# Altium PCB STM32H743I-EVAL2PCBDESIGN.PcbDoc (part 14 of 23)
Units mil, origin at the board's own origin, x right, y up, seen from the top; angles counter-clockwise.
Board outline 6558 x 5417 mil, 8 copper layers (L1_TOP, L2_GND, L3_HS1, L4_POWER, L5_SIG, L6_HS2, L7_GND, L8_BOTTOM), stack 61.368 mil thick; 620 components, 588 nets, 2945 pads, 1724 vias.
Unrouted connection lines stored in the file: 1.
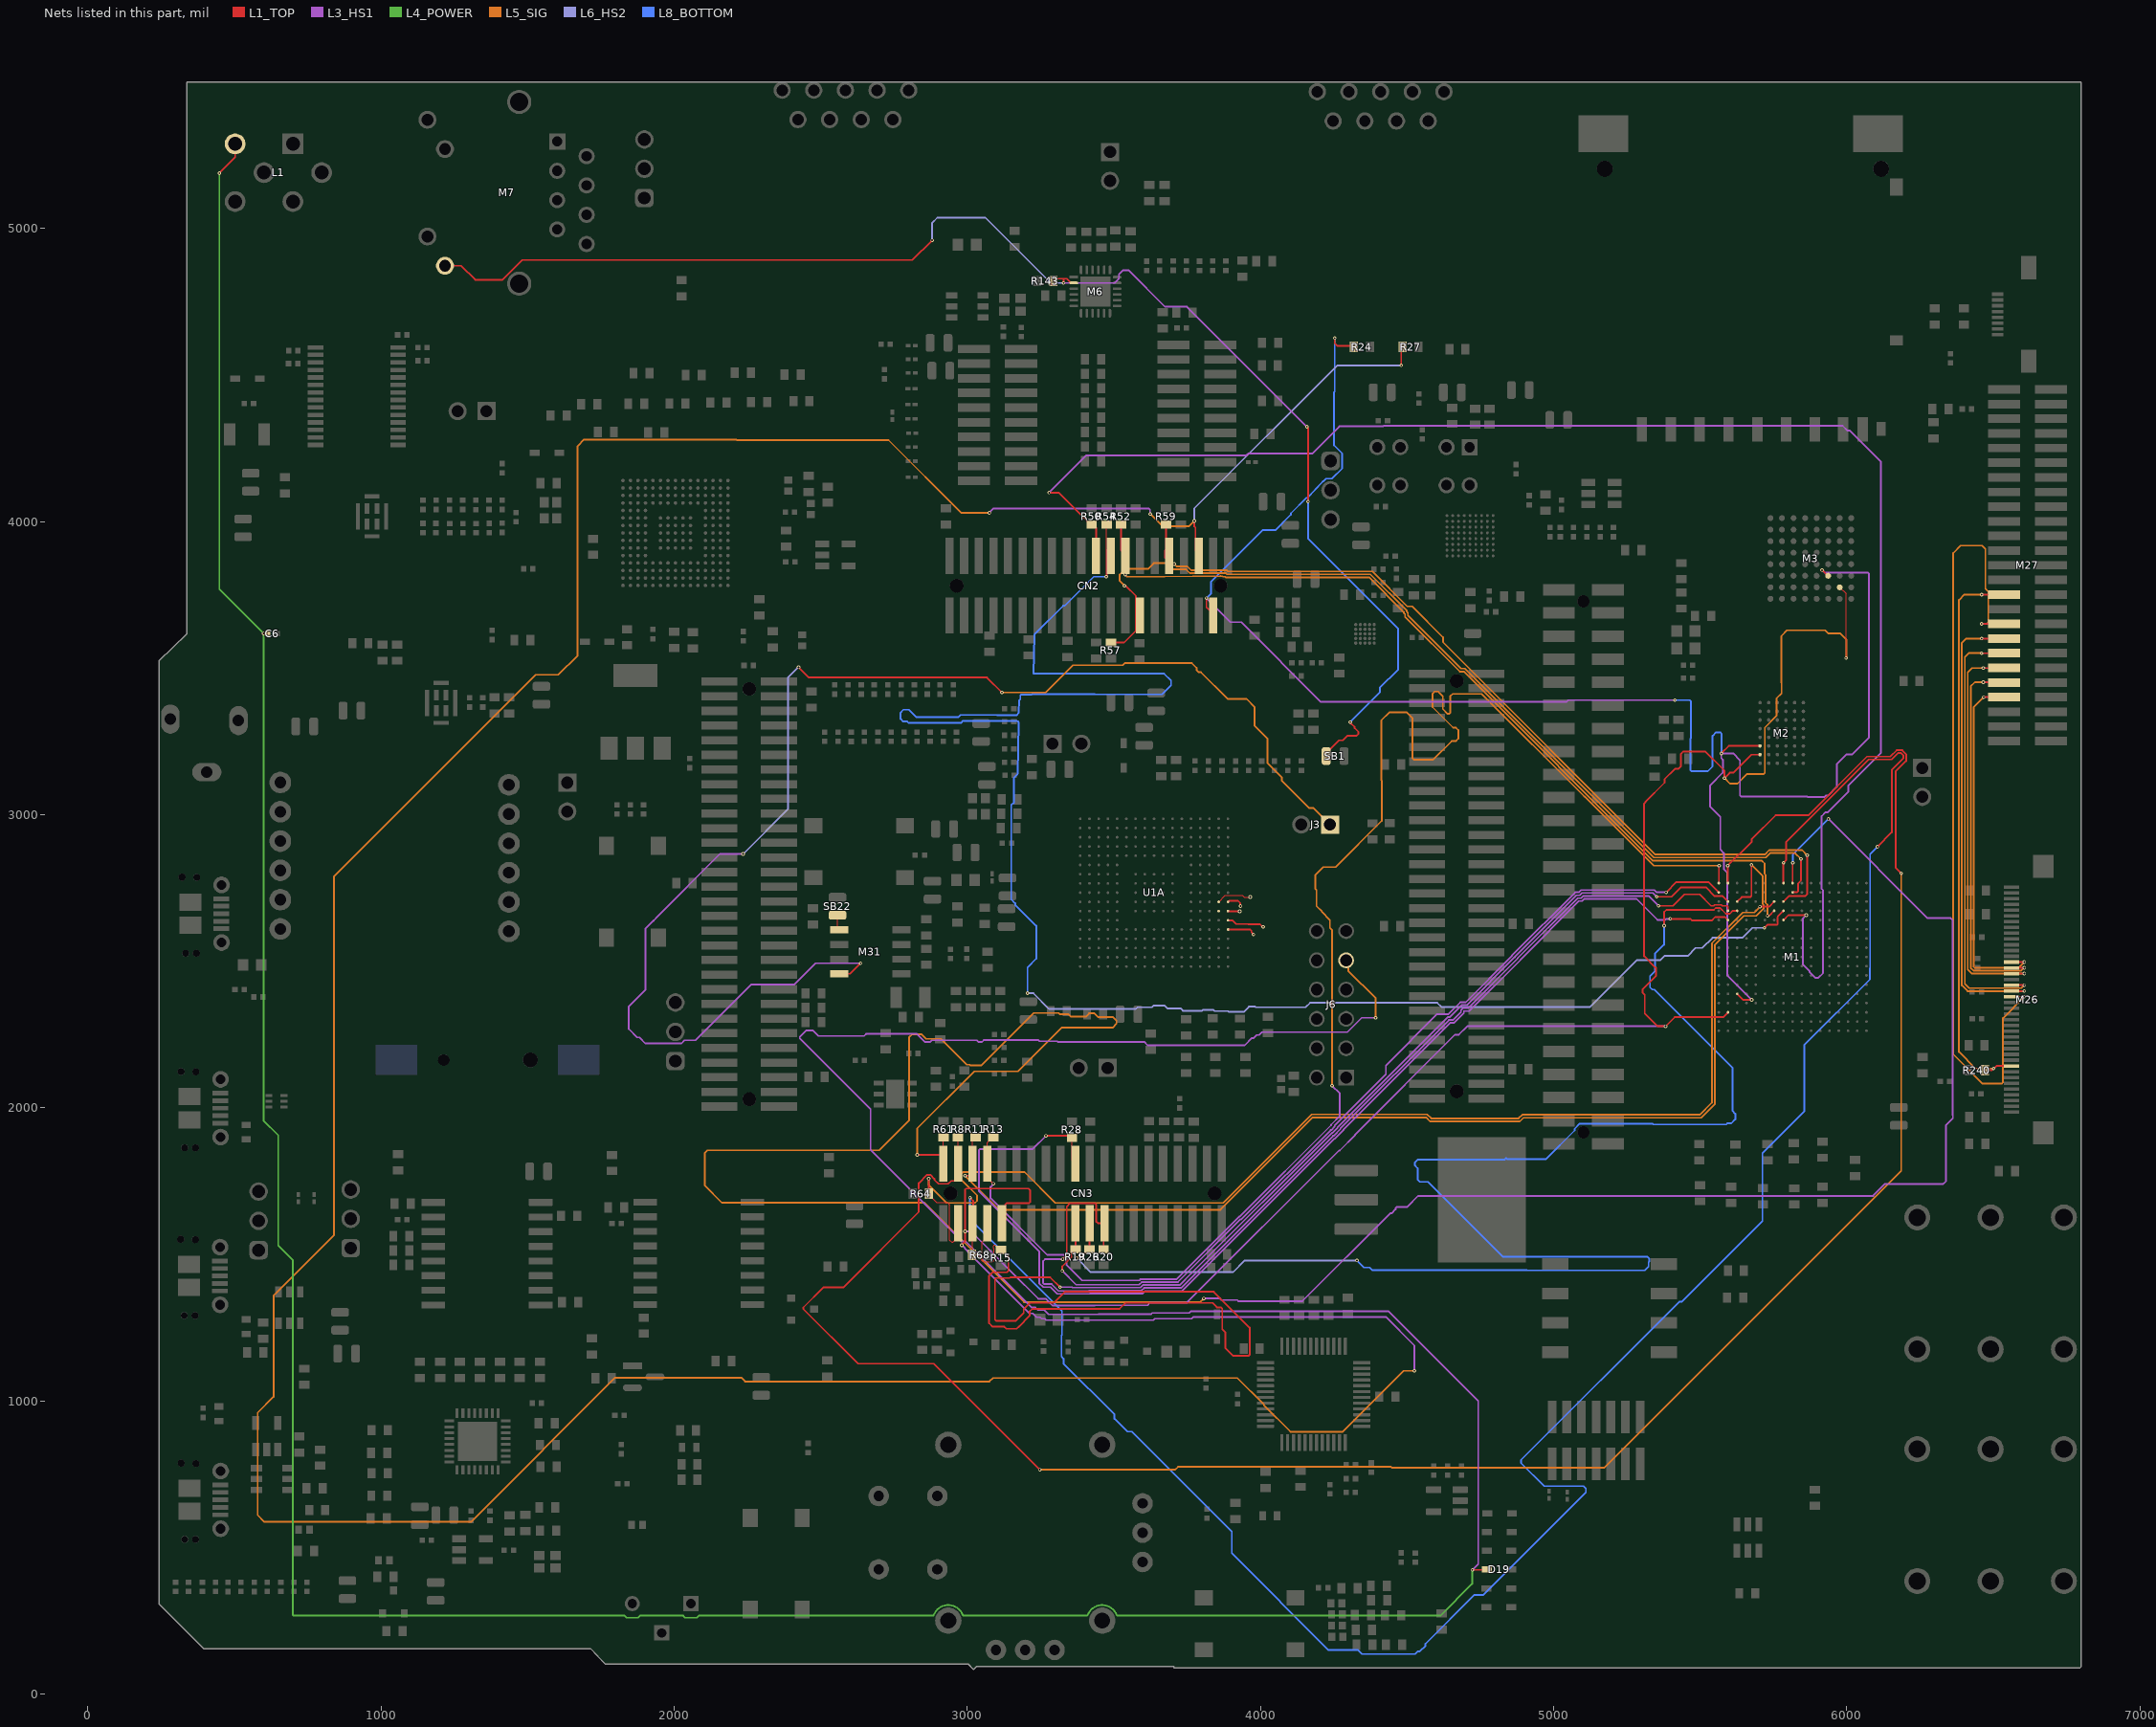
[diagram p11: the nets of this part, all layers, seen from the top]

## Via types
v1: diameter 12, hole 6, L1_TOP to L8_BOTTOM, tented both sides, 1724 vias

## Nets (pads, with @x,y where several pads share a name; then routed paths per layer and width w, separated by ;. In a path a pad name is that pad's centre, name@x,y a point inside that pad or via, vN(x,y) a via of type N, cw(c..) or ccw(c..) an arc to the next point about the centre after c; other vN are vias at no path point) (continued)
D14: CN2.37 M1.N3 M2.F1 M3.F6 R24.2 | length 6231.5
  L1_TOP w6: v1(3816,3739) 3816,3707.5 3825,3698.5 ; v1(4253,4626) 4253,4609 4262.06,4599.94 4314.5,4599.94 R24.2@4318.44,4596 ; v1(5572,3209) 5597.47,3234.47 M2.F1@5704.36,3234.47 ; M1.N3@5626.51,2388.54 5647.05,2368 v1(5676,2368) ; v1(5916,3834.52) M3.F6@5935.37,3815.15
  L3_HS1 w6: v1(3816,3739) 3898,3657 3934.28,3657 4206.28,3385 5044.04,3385 5050.04,3391 v1(5414.1,3391) ; v1(5676,2368) 5592.5,2451.5 5592.5,2803.26 5581,2814.76 5581,2868.88 5569,2880.88 5569,2991.81 5534,3026.81 5534,3099.75 5577.76,3143.51 5577.76,3187.41 5572,3193.17 v1(5572,3209) 5612.57,3209 5636,3185.57 5636,3065.51 5639.51,3062 5865.02,3062 5867.02,3060 5923.43,3060 5928.43,3065 5936.12,3065 5966,3094.88 5966,3172.38 5998.62,3205 6017.14,3205 6076,3263.86 6076,3822.49 6072.49,3826 5924.52,3826 v1(5916,3834.52)
  L8_BOTTOM w6: v1(3816,3739) 3831.57,3754.57 3831.57,3794.93 4007.36,3970.72 4050.86,3970.72 4103.9,4023.75 4103.9,4028.26 4156.94,4081.3 4159.28,4081.34 4161.07,4083.13 4210.58,4134.43 cw(c4239,4107) 4219.14,4141.14 4224.5,4146.5 4243.58,4146.5 4278.5,4181.42 4278.5,4232.58 4251,4260.08 4251,4441.23 4253,4443.23 v1(4253,4626) ; v1(5414.1,3391) 5464.49,3391 5468,3387.49 5468,3261.45 5467,3260.45 5467,3151.51 5470.51,3148 5525.68,3148 5542.38,3164.7 5542.38,3268.76 5554.62,3281 5568.68,3281 5573,3276.68 5573,3210 v1(5572,3209)
D15: CN2.36 CN3.32 M1.R2 M2.G1 M3.G7 R27.2 | length 20020.5
  L1_TOP w4: M3.G7@5976.11,3775.78 5997.74,3754.15 v1(5997.74,3534.41)
  L1_TOP w6: v1(2981,1531) 2981,1532.51 2992,1543.51 v1(2992,1578) 2992,1720.49 2995.51,1724 3208.14,1724 3214.64,1717.51 3214.64,1678.67 3210.49,1674.52 3134.15,1674.52 3129,1669.36 3129,1617 CN3.32@3118,1606 ; v1(3774,4002) 3774,3983.87 3778,3979.87 CN2.36@3778,3901.5 ; v1(4480,4533) 4480,4591.56 R27.2@4484.44,4596 ; M1.R2@5595.02,2325.54 5578.47,2309 5413,2309 v1(5382,2278) 5354.62,2278 5311,2321.62 5311,2384.62 5304,2391.62 5304,2404.38 5349,2449.38 5349,2477 5309,2517 5309,3038.19 5313,3042.19 5313,3043.46 5378.72,3109.18 5378.72,3120.89 5414.13,3156.3 5424.75,3156.3 5434.71,3166.26 5434.71,3208.07 5442.37,3215.73 5517.27,3215.73 5583,3150 v1(5583,3125) 5601,3143 5613.23,3143 5675.18,3204.94 M2.G1@5704.36,3204.94
  L3_HS1 w6: v1(2981,1531) 3001,1511 3001,1508.57 3211.57,1298 3223.57,1298 3236.57,1285 3248.34,1285 3253.34,1280 3264.19,1280 3269.19,1275 3634.43,1275 3639.43,1280 3765.18,1280 3771.18,1286 4427.43,1286 4525,1188.43 v1(4525,1102) ; v1(2992,1578) 3012.14,1578 3151.38,1438.76 3151.38,1438.52 3241.9,1348 3266.9,1348 3289.9,1325 3435.24,1325 3436.24,1326 3614.72,1326 3623.72,1335 3749.47,1335 4268.47,1854 4270.28,1854 4323,1906.72 4323,1908.53 4663.75,2249.28 4676.89,2249.28 4705.62,2278 v1(5382,2278) ; v1(3075,4030) 3090,4045 3619,4045 3623,4041 3623,4027 v1(3624,4026)
  L5_SIG w6: v1(3075,4030) 2979,4030 2731,4278 2212.81,4278 2210.81,4280 1692.62,4280 1670.31,4257.69 1670.31,3543.31 1604.19,3477.19 1527.81,3477.19 839,2788.38 839,1564 633,1358 633,1013.38 579,959.38 579,610 602,587 1306.38,587 1798.38,1079 2228.62,1079 2241.62,1066 3075.31,1066 3087.31,1078 3921,1078 4011.63,987.37 4011.63,985.19 4102.26,894.56 4280.56,894.56 4488,1102 v1(4525,1102) ; v1(3624,4026) 3624.33,4026 3665.84,3984.5 3756.5,3984.5 v1(3774,4002) ; v1(5583,3125) 5602,3106 5627.38,3106 5660.38,3139 5717,3139 5720.51,3142.51 5720.51,3296.9 5760.31,3336.69 5760.31,3396.45 5778,3414.14 5778,3448.53 5777,3449.53 5777,3609.77 5796.23,3629 5926.53,3629 5936.53,3619 5976.49,3619 5999.37,3596.12 5999.37,3540.28 5998.89,3539.8 5998.89,3535.56 v1(5997.74,3534.41)
  L6_HS2 w6: v1(3774,4002) 3774,4044.53 4262.47,4533 v1(4480,4533)
D16: CN2.22 M1.E8 R50.1 | length 5474.8
  L1_TOP w6: v1(3279,4099) 3311.5,4099 3420.06,3990.44 R50.1@3424,3990.44 ; R50.1@3427.94,3990.44 3439,3979.38 CN2.22@3439,3883 ; M1.E8@5783.99,2640.5 5800.49,2657 v1(5862,2657)
  L3_HS1 w6: v1(3279,4099) 3406,4226 3951.64,4226 3957.64,4232 4176,4232 4269,4325 4418,4325 4420,4327 5986,4327 6002,4311 6009.95,4311 6117,4203.95 6117,3211 6006,3100 6006,3078.31 5936.21,3008.52 5927.99,3008.52 5914.52,2995.04 5914.52,2746.76 5919,2742.28 5919,2459.07 5903.32,2443.39 5892.55,2443.39 5873,2462.95 5873,2466.38 5850,2489.38 5850,2645 v1(5862,2657)
D17: CN2.26 M1.D7 R52.1 | length 2986.9
  L1_TOP w6: R52.1@3524,3990.44 3524,3902.5 3536,3890.5 3536,3822.63 3538,3820.62 v1(3538,3819) ; v1(5730,2655) 5731.15,2656.15 5736.64,2656.15 M1.D7@5752.5,2672
  L5_SIG w6: v1(3538,3819) 3545,3812 3672.9,3812 3863.67,3813.93 cw(c3864,3781.5) 3875.02,3812 3879.36,3812 3881.36,3810 4370.67,3810 4489,3691.67 4489,3688.47 4493,3684.47 4493,3675.47 4680.05,3488.43 4693.24,3488.43 5338.67,2843 5710.38,2843 5719.98,2833.41 5719.98,2798.17 5722.98,2795.17 5722.98,2699.55 5730,2692.53 v1(5730,2655)
D18: CN2.24 M1.D8 R54.1 | length 6354.4
  L1_TOP w4: 3475,3901.5 R54.1@3475,3990.44
  L1_TOP w6: v1(3474,3812) 3475,3813 3475,3901.5 ; v1(5719,2614) 5729,2624 5761.49,2624 5765,2627.51 5765,2631.21 5763.99,2632.22 5763.99,2648.79 5765,2649.8 5765,2653.01 M1.D8@5783.99,2672
  L6_HS2 w6: v1(3205,2391) 3225.21,2391 3279.21,2337 3574.28,2337 3580.28,2343 3630.19,2343 3636.19,2349 3671.81,2349 3681.81,2339 3727.14,2339 3735.14,2331 3800.62,2331 3803.62,2334 3838.93,2334 3842.93,2330 3889.38,2330 3892.38,2327 3942.47,2327 3960.47,2345 3981.38,2345 3983.38,2343 4154.22,2343 4169.22,2358 4603.41,2358 4617.41,2344 5124.28,2344 5284.28,2504 5364.47,2504 5378.47,2518 5457.76,2518 5484.76,2545 5507.38,2545 5542.38,2580 5644.62,2580 5678.62,2614 v1(5719,2614)
  L8_BOTTOM w6: 3171.62,3140.93 cw(c3165.62,3141.12) 3171.57,3140.3 cw(c3165.62,3141.08) 3169.87,3136.85 3159,3125.98 3159,3042.14 3150,3033.14 3150,2721.14 3150,2710.86 3163.28,2697.57 3163.28,2692.77 3235,2621.06 3235,2508.47 3205,2478.47 v1(3205,2391) ; 3171.62,3140.98 3174.84,3313.17 ; 3174.84,3313.21 ccw(c3168.84,3313.28) 3168.84,3319.28 3094.1,3319.28 3093.38,3320 2985.29,3320 2978.29,3313 2799.76,3313 2794.76,3318 2780.62,3318 2772,3326.62 2772,3348.38 2781.62,3358 2800.47,3358 2825.47,3333 2970,3333 2977,3340 3101.67,3340 3102.38,3339.28 3167.2,3339.28 3173.78,3345.85 3175.49,3347.57 3175.53,3349.98 3176.28,3389.75 3181,3394.47 3181,3406.49 3184.51,3410 3220.16,3410 3221.16,3411 3435.32,3411 3436.01,3410.31 3664.59,3410.31 3695,3440.72 3695,3457.28 3671.28,3481 3226.14,3481 3228.42,3612.04 3228.47,3614.47 3230.18,3616.18 3327.23,3713.23 3332.62,3713.23 3431.38,3812 v1(3474,3812)
D19: CN2.27 M1.B9 R57.1 | length 3229.7
  L1_TOP w6: R57.1@3490,3587.56 3534.46,3587.56 3575,3628.1 3575,3698.5 3575,3746.02 3541.17,3779.85 3537.15,3779.85 v1(3536,3781) ; M1.B9@5815.49,2734.99 5829.49,2735 5834.37,2739.88 5834.37,2765.79 5844,2775.42 v1(5844,2849)
  L5_SIG w6: v1(3536,3781) 3536,3781.14 3520,3797.14 3520,3819.38 3539.31,3838.69 3616.4,3838.69 3635.71,3858 3677,3858 3698,3837 3746.43,3837 3759.5,3823.93 3881.57,3823.93 3885.5,3820 4374.81,3820 4499,3695.81 4499,3692.62 4503,3688.62 4503,3679.62 4684.19,3498.43 4697.39,3498.43 5341.81,2854 5724.31,2854 5739.31,2869 5824,2869 v1(5844,2849)
D20: CN2.32 M1.C8 R59.1 | length 2972.2
  L1_TOP w6: R59.1@3678,3990.44 3678,3904.5 3675,3901.5 3675,3877 3697,3855 v1(3706,3855) ; M1.C8@5783.99,2703.5 5802.5,2722 5858.49,2722 5865,2728.51 v1(5865,2862)
  L5_SIG w6: v1(3706,3855) 3714,3847 3750.57,3847 3763.64,3833.93 3885.72,3833.93 3889.64,3830 4381.57,3830 4500.57,3711 4517.38,3711 4623,3605.38 4623,3588.57 5347.57,2864 5720.17,2864 5735.17,2879 5848,2879 v1(5865,2862)
D21: CN3.39 M1.A9 R61.1 | length 9437.4
  L1_TOP w4: CN3.39@2918,1808.99 2918,1898.44 R61.1@2919,1899.44
  L1_TOP w6: v1(2829,1839) 2907,1839 2918,1828 CN3.39@2918,1808.99 ; M1.A9@5815.49,2766.49 v1@5815.49,2835.52
  L3_HS1 w6: v1(3807,1349) 3862.05,1349 3867.05,1344 3920.47,1344 3924.47,1340 4143,1340 4443,1640 4447.53,1640 4461,1653.47 4461,1658 4464.86,1661.86 4501,1661.86 4538.14,1699 6090.14,1699 6131.14,1740 6329.49,1740 6339,1749.51 6339,1940.62 6362,1963.62 6362,1974.38 6361.77,1974.62 6361.77,2639.72 6354.49,2647 6276.03,2647 v1(5937.52,2985.52)
  L5_SIG w6: v1(2829,1839) 2829,1929.38 3023.62,2124 3172.62,2124 3321.62,2273 3495.38,2273 3509,2286.62 3509,2297.38 3497.38,2309 3446.7,2309 3433.7,2322 3415.27,2322 3404.16,2310.89 3353.63,2310.89 3345.63,2318.89 3315.38,2318.89 3311.28,2323 3225.81,2323 3046.81,2144 3011.19,2144 3008.19,2147 2998.43,2147 2910.43,2235 2858.62,2235 2842.62,2251 2812.72,2251 2801,2239.28 2801,1956.62 2699.38,1855 2113.17,1855 2103.8,1845.63 2103.8,1735.06 2162.86,1676 2854.38,1676 3193.38,1337 3795,1337 v1(3807,1349)
  L8_BOTTOM w6: v1(5815.97,2836) 5815.97,2863.97 v1(5937.52,2985.52)
D22: CN3.38 M1.C7 R64.1 | length 4251.2
  L1_TOP w4: R64.1@2868.56,1707 2868.56,1703.06 2895.55,1676.07 2931.93,1676.07 2939.48,1668.52 2939.48,1548.38 2947.03,1540.83 2950.35,1540.83 2968,1558.48 CN3.38@2968,1606
  L1_TOP w6: v1(2868,1758) 2868,1707.56 R64.1@2868.56,1707 ; v1(5704,2686) 5735,2686 M1.C7@5752.5,2703.5
  L5_SIG w6: v1(2868,1758) 2868,1736.64 2929.64,1675 3025.38,1675 3033,1682.62 3033,1701 2979,1755 2979,1773.38 2986.62,1781 3194.61,1781 3300.54,1675.07 3872.64,1675.07 4174.57,1977 4568.81,1977 4582.24,1963.57 4880.67,1963.57 4893.1,1976 5498.9,1976 5540.42,2017.51 5540.42,2560.94 5645.69,2666.22 5684.22,2666.22 v1(5704,2686)
D23: CN3.36 M1.A8 R68.1 | length 7279.4
  L1_TOP w4: R68.1@3015.44,1498 3018,1500.56 CN3.36@3018,1606
  L1_TOP w6: v1(3009,1693) 3020,1682 3020,1608 CN3.36@3018,1606 ; M1.A8@5783.99,2766.49 v1@5783.99,2835.52 ; v1(5784.47,2836) 5792.97,2844.5 5792.97,2905.97 6075.16,3188.16 6152.78,3188.16 6174.62,3210 6185.38,3210 6193,3202.38 6193,3191.62 6154,3152.62 6154,2939.59 v1(6104.68,2890.27)
  L8_BOTTOM w6: v1(3009,1693) 3009,1620.38 3323,1306.38 3323,1224.62 3321,1222.62 3321,1150.57 3328,1143.57 3328,1127.38 3502,953.38 3502,938.72 3545.83,894.89 3560.5,894.89 3902,553.38 3902,479.72 4232.41,149.31 4332.92,149.31 4346.23,136 4528,136 4537,145 4543.67,145 4563,164.33 4563,171 4730,338 4761,338 5110,687 5110,700.38 5101.38,709 4967.62,709 4889,787.62 4889,798 5428.81,1337.81 5437.19,1337.81 5712.49,1613.1 5712.49,1844.49 5855,1987 5855,2214 6079,2438 6079,2476.72 6080,2477.72 6080,2865.59 v1(6104.68,2890.27)
D24: CN3.37 M1.A2 R8.2 | length 7622.8
  L1_TOP w4: CN3.37@2968,1808.99 R8.2@2968,1898.44
  L1_TOP w6: CN3.37@2968,1808.99 2968,1761.47 2957,1750.48 2944.9,1750.48 2934.9,1740.48 2901.1,1740.48 2887.24,1754.34 2887.24,1757.14 2873.38,1771 2862.62,1771 2834.22,1742.61 2834.22,1644.98 2576.05,1386.81 2508.81,1386.81 2440.49,1318.49 2440.49,1313.51 2627.22,1126.78 2885.22,1126.78 v1(3247.4,764.6) ; M1.A2@5595.02,2766.49 5594.51,2767 5594.51,2825.49 v1(5594,2826) 5676.32,2908.32 5676.32,2916.83 5757.5,2998 5869,2998 6069.16,3198.16 6148.63,3198.16 6170.47,3220 6189.53,3220 6203,3206.53 6203,3183.14 6167,3147.14 6167,2819 v1(6186,2800)
  L5_SIG w6: v1(3247.4,764.6) 3708.5,764.6 3718.9,775 4445.02,775 4448.02,772 5174.14,772 6186,1783.86 v1(6186,2800)
D25: CN3.35 M1.C3 R11.2 | length 4011.3
  L1_TOP w4: CN3.35@3018,1808.99 3018,1888.44 R11.2@3028,1898.44
  L1_TOP w6: v1(2992,1768) 3007,1768 3018,1779 CN3.35@3018,1808.99 ; M1.C3@5626.51,2703.5 5642.02,2719 5671.49,2719 5675,2722.51 v1(5675,2829)
  L5_SIG w6: v1(2992,1768) 3108,1652 3863.72,1652 4178.72,1967 4564.67,1967 4578.09,1953.57 4884.81,1953.57 4897.24,1966 5503.04,1966 5550.42,2013.37 5550.42,2556.8 5648.23,2654.62 5691,2654.62 5709.38,2673 5717,2680.62 5717,2691.38 5712.98,2695.41 5712.98,2791.02 v1(5675,2829)
D26: CN3.33 M1.A1 R13.2 | length 5337.4
  L1_TOP w4: CN3.33@3068,1808.99 3068,1881.38 3085.06,1898.44 R13.2@3089,1898.44
  L1_TOP w6: CN3.33@3068,1808.99 3068,1761.47 3088.47,1741 v1(3089,1741) ; M1.A1@5563.52,2766.49 5564.07,2767.04 5564.07,2825.07 v1(5565,2826)
  L3_HS1 w6: v1(3089,1741) 3089,1739.79 3079,1729.79 3079,1691 3272,1498 3328.38,1498 3338,1488.38 3338,1465 3392,1411 3586.58,1411 3590.58,1415 3714,1415 3928,1629 3929.53,1629 4241,1940.47 4241,1942 4270.57,1971.57 4270.57,2048.43 v1(4244,2075)
  L5_SIG w6: v1(4244,2075) 4244,2606.86 4237,2613.86 4237,2640.62 4209,2668.62 4209,2670.47 4191.35,2688.12 4191.35,2742.72 4187,2747.07 4187,2793.38 4214.68,2821.07 4255.92,2821.07 4414,2979.14 4414,3115.62 4412,3117.62 4412,3321.38 4439.62,3349 4499.28,3349 4518.95,3329.34 4518.95,3191.44 4522.46,3187.92 4589.31,3187.92 4652.38,3251 4666.53,3251 4675.13,3259.61 4675.13,3288.39 4666.53,3297 4657.22,3297 4587,3367.22 4587,3412.38 4594.62,3420 4605.38,3420 4621.95,3403.44 4621.95,3360.55 4638.51,3343.99 4643.49,3343.99 4647,3347.5 4647,3403.38 4655.62,3412 4754.53,3412 5104.53,3062 5105.53,3062 5341.53,2826 v1(5565,2826)
D27: CN3.34 M1.C2 R15.2 | length 5988.9
  L1_TOP w4: CN3.34@3068,1606 3068,1558.48 3050.78,1541.26 3050.78,1477.8 3054.29,1474.28 3086.82,1474.28 3090.34,1477.8 3090.34,1518.2 3088.88,1519.66 3088.88,1528.74 3091.22,1531.08 3094.54,1531.08 3111.06,1514.56 R15.2@3115,1514.56
  L1_TOP w6: R15.2@3115,1514.56 3118.94,1514.56 3139.72,1493.78 3139.72,1442.76 3135.62,1438.66 3086.06,1438.66 3074.35,1426.95 3074.35,1264.72 3086.06,1253 3125.86,1253 3132.86,1246 3168.42,1246 3175.42,1253 3212.39,1289.98 3212.39,1304.12 3222.35,1314.08 3519.44,1314.08 3539.36,1334 3836.44,1334 3851.39,1319.06 3865.53,1319.06 3869.63,1314.95 3869.63,1244.84 3880,1234.47 3880,1180.62 3907.33,1153.28 3959.12,1153.28 3963.22,1157.38 3963.22,1249.65 3840.87,1372 3332.53,1372 3294.61,1334.08 3214.07,1334.08 3192.39,1312.4 3192.39,1299.39 3166,1273 3097.86,1273 3094.35,1276.51 3094.35,1415.15 3097.86,1418.66 3143.9,1418.66 3146.59,1421.35 3282.65,1421.35 v1(3316,1388) ; v1(5352,2720) 5403,2720 5435,2752 5520,2752 5550,2722 5576.51,2722 M1.C2@5595.02,2703.5
  L3_HS1 w6: v1(3316,1388) 3357.01,1388 3359.01,1386 3589.86,1386 3598.86,1395 3724.62,1395 3766,1436.38 4243.62,1914 4245.43,1914 4263,1931.57 4263,1933.38 4638.9,2309.28 4645.57,2309.28 4686.29,2350 4704.1,2350 4867.64,2513.54 4867.64,2514.59 5078.05,2725 5089.57,2725 5097.38,2732.8 5339.2,2732.8 v1(5352,2720)
D28: CN3.22 M1.B1 R19.2 | length 3053.8
  L1_TOP w6: v1(3324,1443) 3324,1458.84 3354.28,1489.12 3354.28,1506.78 3365.06,1517.56 R19.2@3369,1517.56 3369,1605 CN3.22@3368,1606 ; v1(5384,2735) 5419,2770 5528.51,2770 M1.B1@5563.52,2734.99
  L3_HS1 w6: v1(3324,1443) 3371,1396 3585.72,1396 3594.72,1405 3718.14,1405 3932.14,1619 3934.48,1619 4239.48,1924 4241.28,1924 4253,1935.72 4253,1939.86 4428,2114.86 4428,2144.38 4602.89,2319.28 4641.43,2319.28 4682.15,2360 4699.95,2360 4857.64,2517.69 4857.64,2518.73 5073.9,2735 5085.43,2735 5093.23,2742.8 5343.34,2742.8 5351.14,2735 v1(5384,2735)
D29: CN3.18 M1.D2 R20.2 | length 3590.8
  L1_TOP w6: v1(3325,1483) 3339,1497 3339,1662.41 3351.1,1674.52 3434.9,1674.52 3439.95,1669.46 3439.95,1611.05 3445,1606 CN3.18@3468,1606 3465,1603 R20.2@3465,1517.56 ; v1(5358,2689) 5408,2689 5447,2728 5498,2728 5537,2689 5546.77,2689 5549.77,2692 5571.8,2692 5574.8,2689 5591.5,2689 5595.02,2685.49 M1.D2@5595.02,2672
  L3_HS1 w6: v1(3325,1483) 3264.82,1483 3258,1476.18 3258,1402.62 3262.62,1398 3287.62,1398 3310.62,1375 3414.53,1375 3415.53,1376 3594.01,1376 3603.01,1385 3728.76,1385 3776,1432.24 4247.76,1904 4249.57,1904 4273,1927.43 4273,1929.24 4643.04,2299.28 4656.18,2299.28 4684,2327.1 4684,2333.57 4690.43,2340 4708.24,2340 4877.64,2509.4 4877.64,2510.45 5082.19,2715 5093.72,2715 5101.52,2722.8 5324.2,2722.8 v1(5358,2689)
D30: CN3.20 M1.D3 R26.2 | length 5426.1
  L1_TOP w6: v1(3373,1487) 3374.15,1488.15 3383.65,1488.15 3413.06,1517.56 R26.2@3417,1517.56 3417,1605 CN3.20@3418,1606 ; v1(5377,2621) 5377,2667.38 5384.62,2675 5546.91,2675 5553.91,2682 5567.66,2682 5587.66,2662 5601.7,2662 5611.7,2672 M1.D3@5626.51,2672
  L6_HS2 w6: v1(3373,1487) 3421,1439 3906.38,1439 3946.38,1479 v1(4329,1479)
  L8_BOTTOM w6: v1(4329,1479) 4353,1455 4371.86,1455 4380.49,1446.37 4907.53,1446.37 4908.9,1445 5310.53,1445 5324,1458.47 5324,1472.62 5327,1475.62 5327,1484.14 5320.14,1491 4828,1491 4572,1747 4543.62,1747 4536,1754.62 4536,1793.62 4527,1802.62 4527,1813.38 4536.12,1822.5 4832.5,1822.5 4838,1828 4841,1825 4974.38,1825 5071.91,1922.52 5071.91,1927.94 5089.43,1945.46 5337.98,1945.46 5340.44,1943 5589,1943 5593,1947 5606.53,1947 5620,1960.47 5620,1979.53 5610,1989.53 5610,2136.53 5343.53,2403 5336.62,2403 5329,2410.62 5329,2448.62 5346,2465.62 5346,2525.38 5377,2556.38 v1(5377,2621)
D31: CN3.21 M1.E2 R28.2 | length 3943.4
  L1_TOP w4: R28.2@3357,1897.44 3357,1819.99 CN3.21@3368,1808.99
  L1_TOP w6: v1(3268,1904) 3350.44,1904 R28.2@3357,1897.44 ; v1(5398,2645) 5399,2644 5467.41,2644 5472.41,2639 5539.19,2639 5550.7,2650.5 5585.02,2650.5 M1.E2@5595.02,2640.5
  L3_HS1 w6: 3104.32,1859 3043.51,1859 3040,1855.49 3040,1715 3245,1510 3245,1401.47 3258.47,1388 3283.47,1388 3306.47,1365 3418.67,1365 3419.67,1366 3598.15,1366 3607.15,1375 3732.9,1375 4251.9,1894 4253.71,1894 4283,1923.29 4283,1925.1 4647.18,2289.28 4660.33,2289.28 4694,2322.95 4694,2329.43 4694.57,2330 4712.38,2330 4887.64,2505.26 4887.64,2506.31 5086.33,2705 5097.86,2705 5105.66,2712.8 5127.96,2712.8 5282.47,2712.8 5354.27,2641 5380,2641 5383,2644 5397,2644 v1(5398,2645) ; 3104.33,1858.99 3131.67,1858.99 ; 3131.68,1859 3223,1859 v1(3268,1904)
DSI_CKN: U1A.L17 | length 40.4
  L1_TOP w6: U1A.L17@3888.98,2671.02 3889.49,2670.51 3928.49,2670.51 v1(3929,2670)
DSI_CKP: U1A.L16
DSI_D0N: U1A.M17 | length 129.3
  L1_TOP w6: U1A.M17@3888.98,2639.52 3904.31,2639.52 3916.83,2627 3956.92,2627 3957.92,2626 3998.38,2626 4007.38,2617 v1(4009,2617)
DSI_D1N: U1A.K17 | length 57.4
  L1_TOP w6: U1A.K17@3888.98,2702.51 3889.76,2702.51 3893.25,2706 3923.44,2706 3930.85,2698.59 3930.85,2689.15 v1(3932,2688)
DSI_D1P: U1A.K16 | length 120.1
  L1_TOP w4: U1A.K16@3857.49,2702.51 3879.98,2725 3937.72,2725 3944.73,2718 3964,2718 v1(3965,2719)
DSI_VDD12: U1A.N17 | length 97.6
  L1_TOP w6: U1A.N17@3888.98,2608.02 3927.64,2608.02 3965,2608 3969.22,2603.78 3969.22,2599.4 3976,2592.62 v1(3976,2591)
E5V: C6.1 D19.2 J6.09 L1.3 | length 15194
  L1_TOP w6: v1(448,5189) 502,5243 L1.3@502,5289 ; v1(599,3618) C6.1@613,3618 ; v1(4723,423) 4770.87,423 D19.2@4771.87,424
  L3_HS1 w6: v1(4393,2307) 4345.5,2307 4296.5,2258 4004.96,2258 3995.37,2248.41 3987.22,2248.41 3976.81,2238 3971.43,2238 3946.43,2213 3615.48,2213 3603.48,2225 3495.47,2225 3494.47,2224 3309.38,2224 3306.38,2227 3246.49,2227 3242.49,2231 3056.38,2231 3049.38,2224 3038.62,2224 3032.62,2230 2878.53,2230 2873.53,2225 2854.47,2225 2827.47,2252 2654.72,2252 2647.72,2245 2491.53,2245 2472.53,2264 2450.72,2264 2428.2,2241.49 2428.2,2236.51 2670,1994.72 2670,1856.86 2959,1567.86 2959,1564.33 2979.33,1544 2993.86,1544 3219.86,1318 3231.86,1318 3240.43,1309.43 3263.05,1309.43 3277.48,1295 3447.67,1295 3448.67,1296 3627.14,1296 3631.14,1300 3756.9,1300 3762.9,1306 4435.72,1306 4743,998.72 4743,443 v1(4723,423)
  L4_POWER w6: v1(448,5189) 448,3770 v1@599,3619 ; v1(599,3618) 599,1956.38 649.2,1906.19 649.2,1530.05 698.24,1481 698.24,270.27 701.76,266.76 1830.36,266.76 1837.12,260 1876.88,260 1883.64,266.76 2030.36,266.76 2037.12,260 2076.88,260 2083.64,266.76 2883.05,266.76 2884.81,268.51 ; 2884.84,268.55 2888.19,274.86 cw(c2935,250) 2984.33,269.38 2985.19,268.52 2986.95,266.76 3408.05,266.76 3409.81,268.51 ; 3409.84,268.55 3413.19,274.86 cw(c3460,250) 3509.33,269.38 3510.19,268.52 3511.95,266.76 4613.37,266.76 4722,375.38 4722,422 v1(4723,423)
  L5_SIG w6: J6.09@4292,2503 4299.38,2495.62 4299.38,2467 4393,2373.38 v1(4393,2307)
ENB: M26.9 M27.22 R240.1 | length 1941.6
  L1_TOP w6: v1(6460,3751) M27.22@6537,3751 ; R240.1@6471.56,2128 6494.34,2128 6500.34,2134 v1(6501,2134) 6502.62,2134 6511.2,2142.58 M26.9@6562.11,2142.62
  L5_SIG w6: v1(6460,3751) 6401.51,3751 6383,3732.49 6383,2190.43 6439.43,2134 v1(6501,2134)
ETH_INT: M6.2 M7.12 R143.1 SB1.1 | length 4920.7
  L1_TOP w6: M7.12@1217.84,4873 1273.12,4873 1321.09,4825.02 1414.26,4825.02 1481.75,4892.51 2812.51,4892.51 v1(2880,4960) ; R143.1@3293.56,4821 3301.56,4829 3328,4829 ; v1(3328,4814) 3328,4829 ; M6.2@3363.16,4814.53 3353.25,4814.53 3338.78,4829 3328,4829 ; v1(4158.74,4323.59) 4158.74,4321.97 4162.32,4318.39 v1(4162.32,4068.3) ; SB1.1@4224,3200 4224,3210.34 4267.47,3253.81 4281.19,3253.81 4296.96,3269.58 4328.31,3269.58 4334,3275.27 4334,3282.73 4321,3295.73 4321,3299.7 4306,3314.7 v1(4306,3315.6)
  L3_HS1 w6: v1(3328,4814) 3501.62,4814 3517,4829.38 3517,4843.53 3531.47,4858 3549.53,4858 3674.53,4733 3749.34,4733 v1(4158.74,4323.59)
  L6_HS2 w6: v1(2880,4960) 2880,5019.38 2897.62,5037 3061.38,5037 3284.38,4814 v1(3328,4814)
  L8_BOTTOM w6: v1(4162.32,4068.3) 4162.32,3942.06 4469,3635.38 4469,3494.38 4407.15,3432.54 4407.15,3416.76 v1(4306,3315.6)
FDCAN1_RX: J3.1 M31.4 | length 4750.3
  L1_TOP w6: v1(2424,3503) 2459,3468 3066.8,3468 v1(3117.93,3416.87) ; M31.4@2562.7,2457 2600,2457 v1(2636,2493)
  L3_HS1 w6: v1(2235.02,2866.02) 2156.02,2866.02 1937,2647 1937,2645.62 1929.38,2638 1928,2638 1902,2612 1902,2403 1845,2346 1845,2268.62 1873.62,2240 1881.14,2240 1901.64,2219.5 2024.57,2219.5 2035.07,2230 2072,2230 2262,2420 2408.38,2420 2481.38,2493 v1(2636,2493)
  L5_SIG w6: v1(3117.93,3416.87) 3118.06,3417 3267.91,3417 3360.91,3510 3529.62,3510 3536.62,3517 3766,3517 3782,3501 3782,3493.62 3789.62,3486 3797,3486 3888,3395 3952,3395 3980,3367 3980,3303 4024,3259 4024,3175.1 4073,3126.1 4073,3115.62 4165.5,3023.12 4180.42,3023.12 J3.1@4237.21,2966.33
  L6_HS2 w6: v1(2235.02,2866.02) 2388,3019 2388,3468 2423,3503 v1(2424,3503)
FDCAN1_TX: M31.1 SB22.1 | length 52.4
  L1_TOP w4: SB22.1@2557,2657 2557,2612.7 M31.1@2562.7,2607
G2: M26.27 M27.08 | length 1229.8
  L1_TOP w6: v1(6467,3401) M27.08@6537,3401 ; M26.27@6562.11,2496.95 6562.16,2497 v1(6606,2497)
  L5_SIG w6: v1(6467,3401) 6433,3367 6433,2481.51 6436.51,2478 6587,2478 v1(6606,2497)
G3: M26.26 M27.10 | length 1315.1
  L1_TOP w6: v1(6466,3452) 6536,3452 M27.10@6537,3451 ; M26.26@6562.16,2477.31 v1(6606,2477.31)
  L5_SIG w6: v1(6466,3452) 6437.51,3452 6423,3437.49 6423,2477.37 6432.37,2468 6595.06,2468 6604.38,2477.31 v1(6606,2477.31)
G4: M26.25 M27.12 | length 1386.6
  L1_TOP w6: v1(6466,3500) 6536,3500 M27.12@6537,3501 ; M26.25@6562.16,2457.63 v1(6606,2457.63)
  L5_SIG w6: v1(6466,3500) 6427.51,3500 6413,3485.49 6413,2472.14 6427.51,2457.63 v1(6606,2457.63)
G5: M26.23 M27.14 | length 1512.1
  L1_TOP w6: v1(6460,3551) M27.14@6537,3551 ; M26.23@6562.16,2418.26 v1(6606,2418.26)
  L5_SIG w6: v1(6460,3551) 6459.26,3551.74 6417.51,3551.74 6403,3537.23 6403,2422.51 6417.51,2408 6595.74,2408 v1(6606,2418.26)
G6: M26.22 M27.16 | length 1584.1
  L1_TOP w6: v1(6460,3601) M27.16@6537,3601 ; M26.22@6562.16,2398.57 v1(6606,2398.57)
  L5_SIG w6: v1(6460,3601) 6407.51,3601 6393,3586.49 6393,2417.51 6412.51,2398 6605.43,2398 v1(6606,2398.57)
G7: M26.21 M27.18 | length 2771.1
  L1_TOP w6: v1(6460,3651) M27.18@6537,3651 ; M26.21@6562.16,2378.89 v1(6606,2378.89)
  L5_SIG w6: v1(6460,3651) 6477.49,3651 6483,3656.51 6483,3760.53 6473,3770.53 6473,3906.38 6461.38,3918 6388.37,3918 6363,3892.63 6363,2182.14 6462.14,2083 6529.49,2083 6533,2086.51 6533,2305.89 v1(6606,2378.89)